# Altium PCB Karta_ILS.PCBDOC (part 9 of 9)
Units mm, origin at the board's own origin, x right, y up, seen from the top; angles counter-clockwise.
Board outline 70 x 83.2 mm, 6 copper layers (TopLayer, Layer 1, Layer 2, Layer 3, Layer 4, Bottom Layer), stack 0.914 mm thick; 406 components, 271 nets, 1327 pads, 719 vias.
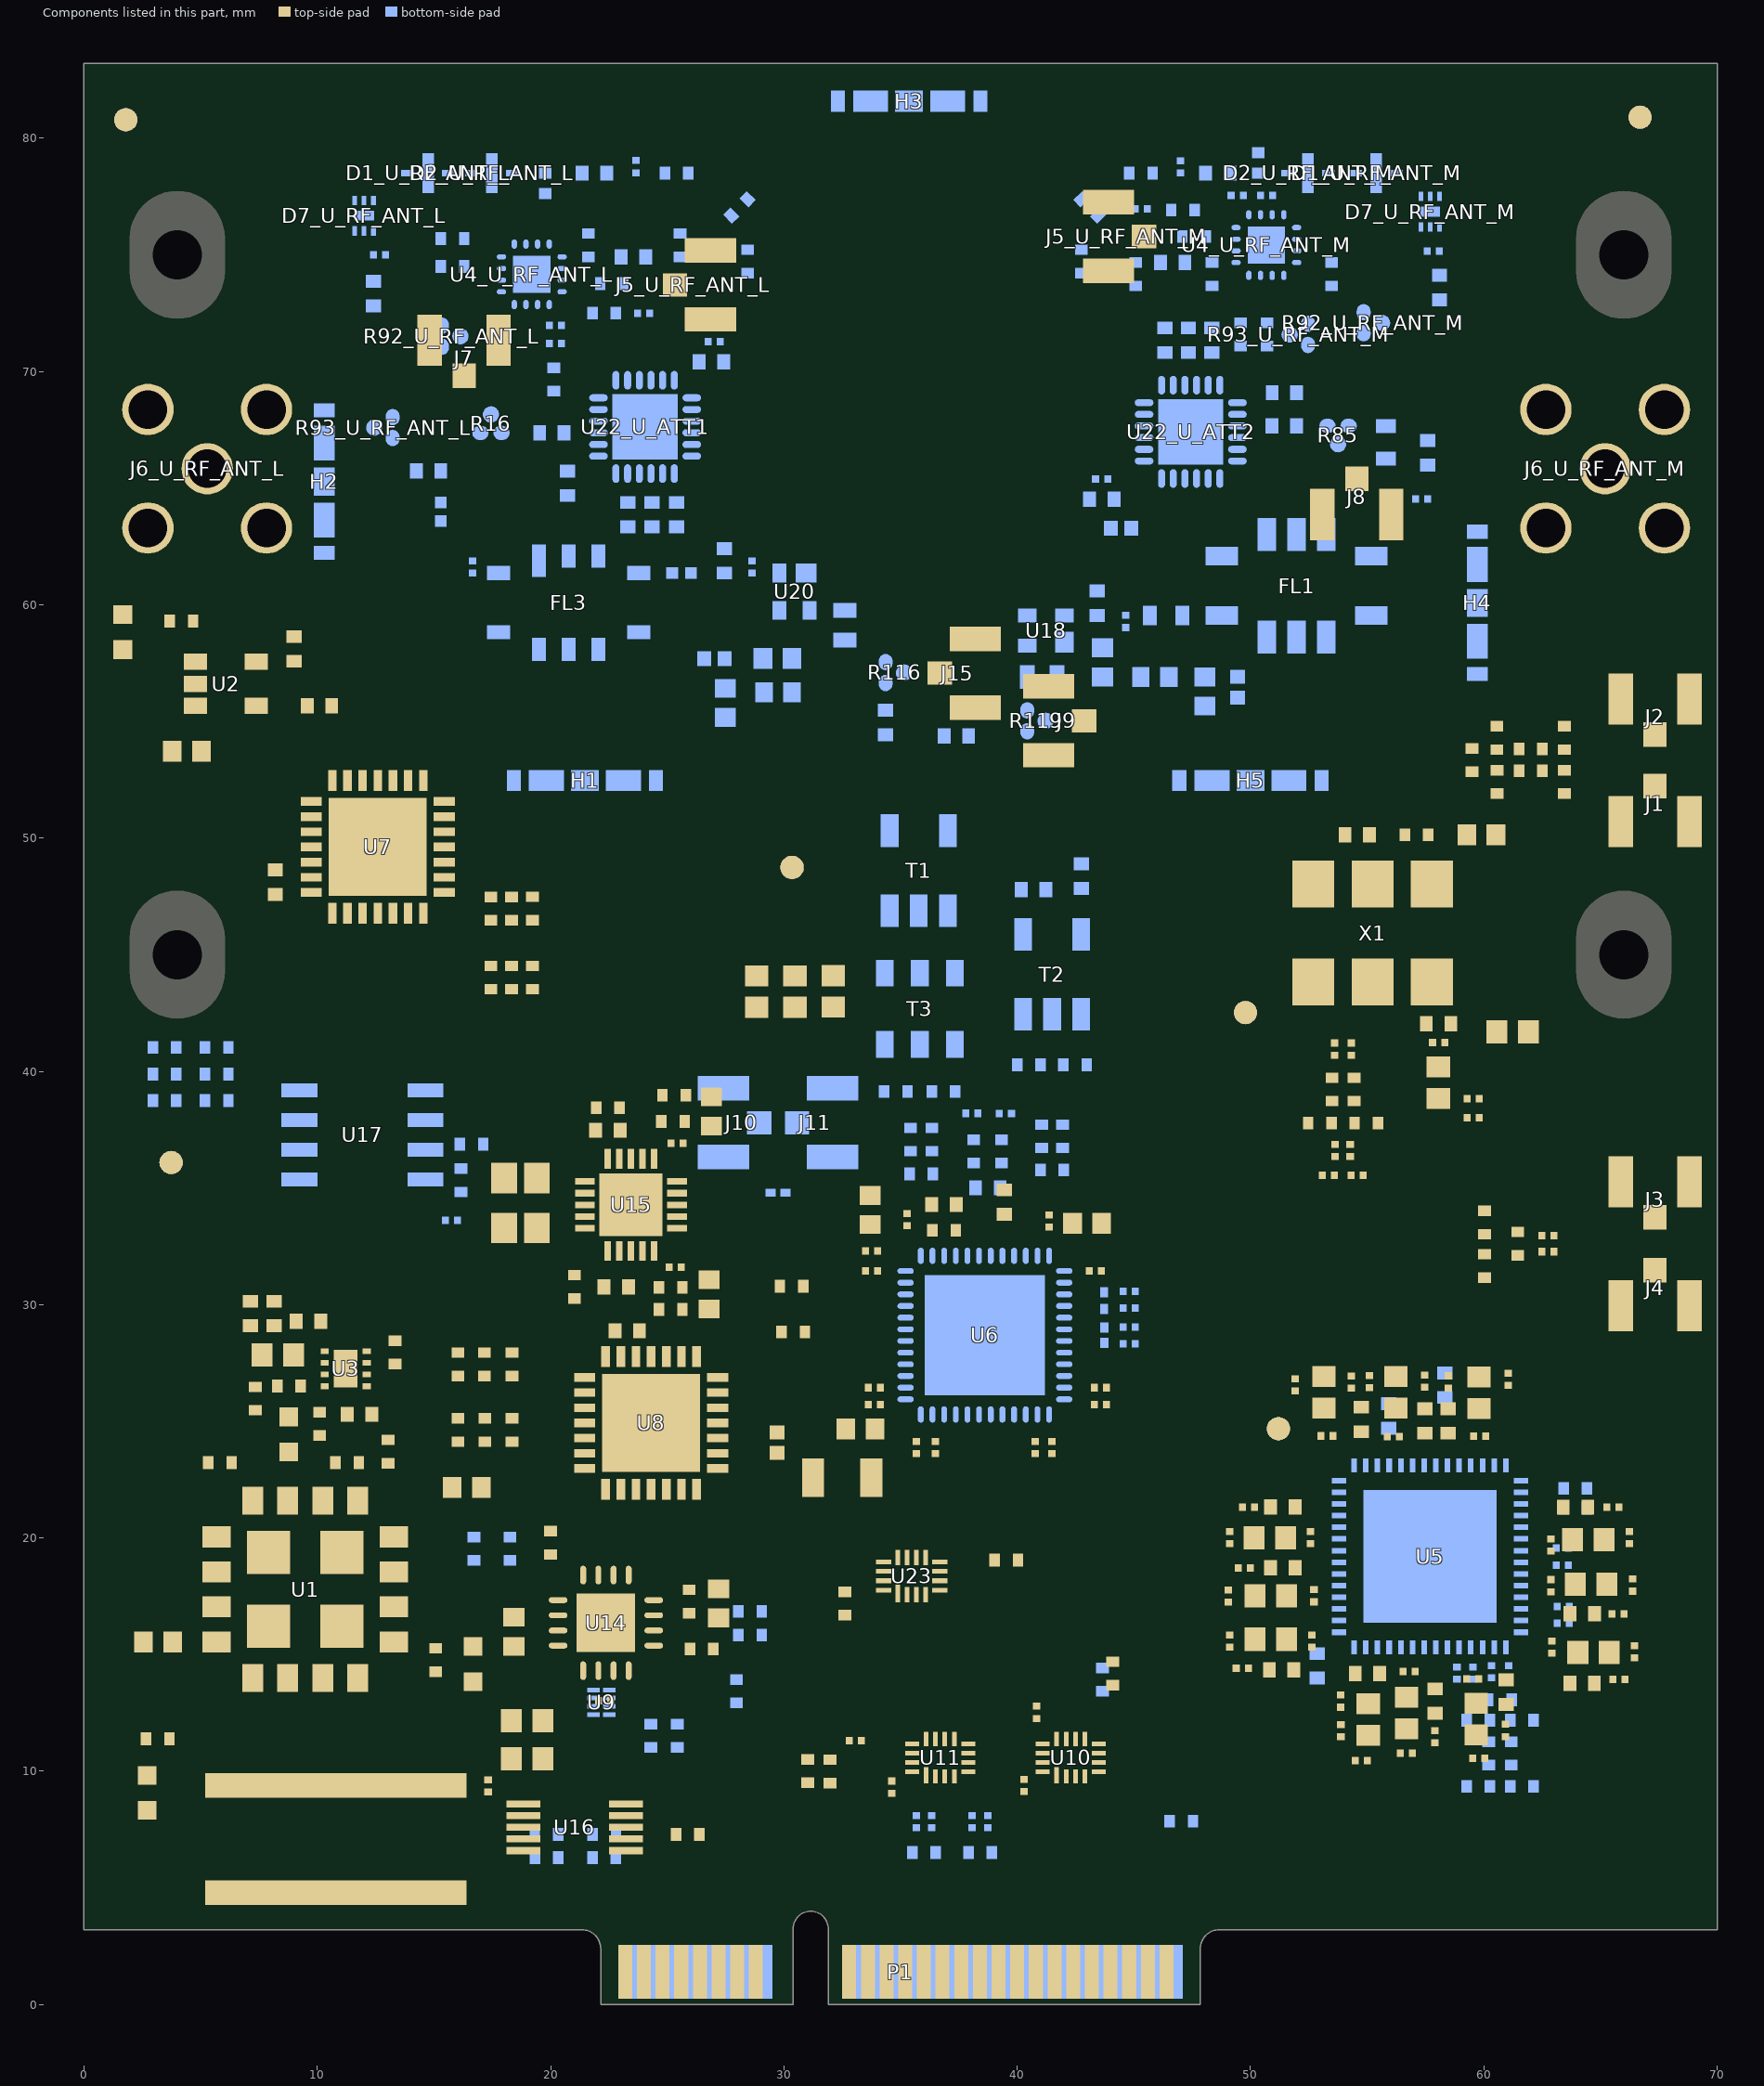
[diagram p10: the components of this part, seen from the top]

## Other copper (continued)
Bottom Layer:
  pour cut-out: 62.22,27.323 62.22,26.313 62.305,26.229 63.54,26.229 63.54,24.229 64.986,22.784 65.587,22.784 65.776,22.972 65.776,26.769 65.789,26.783 65.135,27.438 62.335,27.438
  pour cut-out: 38.661,20.556 38.671,20.546 40.279,20.546 40.279,12.77 40.111,12.602 39.236,12.602 38.661,13.177
  pour cut-out: 41.792,27.817 41.794,27.815 46.3,27.815 46.3,19.412 47.136,18.576 50.286,18.576 50.553,18.31 50.988,18.31 50.988,13.924 50.589,13.526 50.547,13.568 49.32,13.568 49.32,12.173 49.337,12.156 49.337,11.198 48.732,10.594 47.135,10.594 46.566,10.025 46.54,10.025 46.54,9.272 45.473,8.205 42.439,8.205 41.713,8.931 41.713,20.985 40.072,22.626 40.072,24.36 40.186,24.474 41.56,24.474 41.56,24.798 41.798,25.036
  pour cut-out: 47.157,8.815 55.386,8.815 59.035,12.464 59.485,12.464 59.485,8.752 58.305,7.572 47.783,7.572 46.962,8.392 46.993,8.423 46.993,8.847
  pour cut-out: 61.293,15.956 61.413,15.836 65.094,15.836 65.094,8.778 63.888,7.572 62.076,7.572 61.293,8.356
  pour cut-out: 61.186,27.394 61.224,27.356 61.224,26.156 59.98,24.911 59.374,24.911 58.651,25.635 58.651,27.347 58.699,27.394
  pour cut-out: 34.615,26.958 33.984,26.958 33.62,26.593 33.62,24.323 33.16,24.323 32.64,24.842 32.64,27.026 32.885,27.271 34.655,27.271 34.655,26.998
  pour cut-out: 32.623,24.323 37.107,24.323 37.485,23.944 37.485,12.788 33.144,12.788 32.721,13.212
  pour cut-out: 33.036,9.997 34.804,9.997 35.091,9.71 35.091,3.327 34.083,3.327 33.027,4.384 33.027,9.968
  pour cut-out: 61.918,12.664 62.555,12.664 62.555,11.714 61.951,11.714
  pour cut-out: 61.951,9.822 62.555,9.822 62.555,8.872 61.855,8.872
  pour cut-out: 58.835,9.822 59.435,9.822 59.435,9.122 59.485,9.072 59.01,9.072 58.835,9.247
  pour cut-out: 29.558,13.097 31.261,13.097 31.261,11.867 32.394,10.734 32.394,8.821 32.122,8.549 30.113,8.549 29.372,9.29 29.372,12.91
  pour cut-out: 46.828,25.873 48.662,25.873 48.699,25.836 48.699,21.633 49.244,21.088 49.244,20.283 48.842,19.882 47.135,19.882 46.828,20.188
  pour cut-out: 28.68,7.71 29.458,7.71 32.857,4.311 32.857,3.327 30.546,3.327 29.947,2.728 28.765,2.728 28.68,2.814
  pour cut-out: 33.896,13.212 36.456,13.212 36.879,12.788 37.623,12.788 37.623,11.276 37.451,11.104 35.53,11.104 33.896,12.738
  pour cut-out: 15.638,28.115 19.362,28.115 19.836,27.642 19.836,22.35 18.97,21.485 17.957,21.485 17.766,21.676 16.711,20.621 16.711,20.089 16.286,19.664 16.236,19.714 15.137,19.714 14.456,20.394 14.456,26.933
  pour cut-out: 25.667,13.638 25.688,13.617 28.664,13.617 29.5,12.781 29.372,12.653 29.372,8.402 28.68,7.71 26.666,7.71 25.667,8.709
  pour cut-out: 19.227,11.995 19.227,11.349 20.172,10.404 23.061,10.404 24.025,11.368 24.025,12.281 23.875,12.431 19.664,12.431
  pour cut-out: 16.008,19.089 17.606,19.089 18.288,18.406 18.288,12.383 17.976,12.071 16.771,12.071 15.861,12.981 15.861,18.941

## Silkscreen, mask and mechanical layers (free items; w line width, h text height)
TopOverlay:
  drawing of 56 lines, arcs and shapes, not listed
  text "J5" at 29.689,72.996 h1 r90
  text "J6" at 0.989,65.498 h1 r90
  text "J6" at 61.499,65.411 h1 r90
Bottom Overlay:
  lines w0.1: 10.2,68.871 10.2,81.7 31.713,81.7 ; 10.217,61.6 10.217,52.368 10.278,52.368 17.755,52.368 ; 25.1,52.368 46.332,52.368 ; 38.948,81.7 59.722,81.7 59.722,63.772 ; 53.613,52.368 59.722,52.368 59.722,56.367
  text "C187" at 23.889,81.458 h1 r90
  text "C187" at 47.314,81.458 h1 r90
  text "D1" at 15.294,81.143 h1 r90
  text "D2" at 17.706,81.143 h1 r90
  text "L1" at 50.429,81.143 h1 r90
  text "D2" at 52.713,81.143 h1 r90
  text "D1" at 55.525,81.143 h1 r90
  text "L1" at 20,80.1 h1 r90
  text "C160" at 22.857,79.35 h1
  text "C160" at 49.519,79.35 h1
  text "R8" at 25.85,79.321 h1
  text "R8" at 45.788,79.321 h1
  text "R78" at 41.476,77.869 h1 r90
  text "R83" at 22.845,77.577 h1 r90
  text "R90" at 47.724,77.429 h1
  text "C11" at 45.082,77.298 h1
  text "D1" at 11.077,77.033 h1 r90
  text "R78" at 29.989,76.8 h1 r90
  text "D7" at 58.55,76.538 h1 r270
  text "C13" at 53.945,76.303 h1
  text "C12" at 55.575,76.314 h1
  text "U4" at 20.224,76.05 h1
  text "R80" at 26.866,75.951 h1 r90
  text "R89" at 14.544,75.674 h1
  text "C10" at 24.462,75.553 h1
  text "R9" at 41.795,75.119 h1 r90
  text "C186" at 56.936,74.979 h1
  text "R91" at 54.67,74.835 h1 r90
  text "C159" at 59.575,74.793 h1 r90
  text "C186" at 12.093,74.758 h0.75
  text "R80" at 44.277,74.719 h1 r90
  text "R9" at 29.689,74.3 h1 r90
  text "R86" at 14.561,74.155 h1
  text "R89" at 49.949,74.169 h1 r90
  text "R86" at 51.079,74.154 h1 r90
  text "C159" at 11.689,74 h1 r90
  text "R88" at 25.33,73.499 h1
  text "C10" at 47.458,73.393 h1
  text "R83" at 47.413,72.996 h1 r180
  text "C185" at 43.931,72.307 h1 r90
  text "C184" at 44.687,72.307 h1 r90
  text "C183" at 45.451,72.325 h1 r90
  text "C12" at 19.324,71.718 h1
  text "C11" at 24.864,71.348 h1
  text "R92" at 56.546,71.326 h1 r270
  text "R90" at 23.125,71.267 h1
  text "C13" at 19.324,70.957 h1
  text "R93" at 53.257,70.965 h1 r270
  text "R92" at 13.905,70.88 h1 r270
  text "C180" at 29.989,70.89 h1
  text "R91" at 19.313,70.4 h1 r90
  text "C181" at 29.989,69.977 h1
  text "C182" at 53.54,69.741 h1
  text "R93" at 13.917,67.071 h1 r270
  text "U22" at 26.793,66.845 h1 r270
  text "C182" at 20.013,66.031 h1 r90
  text "C180" at 40.666,65.821 h1 r180
  text "C184" at 27.327,64.996 h1 r90
  text "C185" at 28.009,64.996 h1 r90
  text "C183" at 26.611,64.98 h1 r90
  text "C181" at 40.666,64.819 h1 r180
PCI-SIG Outline:
  lines w0.1: 22.15,2.4 ccw(c21.35,2.4) 21.35,3.2 0,3.2 0,83.2 70,83.2 70,3.2 48.659,3.2 ccw(c48.659,2.391) 47.85,2.391 47.85,2.119 47.85,0 31.9,0 31.9,3.236 ccw(c31.143,3.236) 31.143,3.994 ccw(c31.143,3.251) 30.4,3.251 30.4,0 22.15,0 22.15,2.4 ; 22.15,2.4 22.15,2.4